# Allegro board 980XS-I6K51D-1119-2.brd

Outline 581.66 x 429.26 mm; copper layers: TOP, L02_GND, L03_DPS, L04_GND, L05_DPS, L06_GND, L07_DPS, L08_GND, L09_DPS, L10_GND, L11_DPS, L12_GND, L13_SIGNAL, L14_GND, L15_SIGNAL, L16_GND, L17_SIGNAL, L18_GND, L19_SIGNAL, L20_GND, L21_SIGNAL, L22_GND, L23_SIGNAL, L24_GND, L25_SIGNAL, L26_GND, L27_SIGNAL, L28_GND, L29_SIGNAL, L30_GND, L31_SIGNAL, L32_GND, L33_SIGNAL, L34_GND, L35_DPS, L36_UDB, L37_GND, BOTTOM. Coordinates in mm from the lower left corner of the outline.
Outline path: 0,429.26 206.45,429.26 arc(217.17,423.61) 227.89,429.26 353.77,429.26 arc(364.49,423.61) 375.21,429.26 581.66,429.26 581.66,0 301.55,0 arc(290.83,5.65) 280.11,0 0,0 0,429.26

## Placement (name value [footprint] x y rotation side)
BD5  BD120-1.5A-S4-MU  [FB0402]  543.47 239.79 270 bottom
BD9  BD120-1.5A-S4-MU  [FB0402]  224.66 243.83 270 bottom
BD21  BD120-1.5A-S4-MU  [FB0402]  222.95 232.36 0 bottom
BD1721  BD120-1.5A-S4-MU  [FB0402]  543.47 226.84 270 bottom
BD1722  BD120-1.5A-S4-MU  [FB0402]  543.09 213.5 270 bottom
BD1723  BD120-1.5A-S4-MU  [FB0402]  543.09 199.41 270 bottom
BD1728  BD120-1.5A-S4-MU  [FB0402]  245.15 273.73 180 bottom
BDB5  BD120-1.5A-S4-MU  [FB0402]  232.36 264.33 270 bottom
BDB6  BD120-1.5A-S4-MU  [FB0402]  220.55 264.33 270 bottom
BDB7  BD120-1.5A-S4-MU  [FB0402]  211.03 234.89 0 bottom
BDB8  BD120-1.5A-S4-MU  [FB0402]  211.03 246.46 0 bottom
BGA293-9X7-P0.4  REF-CODE-SOCKET  [SOCKET_CODE]  284.21 469.34 0 top
C262  0.1U-16-X7S-S2-MU  [C0201]  224.41 232.06 270 bottom
C264  NC/10U-16-X7R-S8-SS  [C0805]  243.28 276.07 0 bottom
C267  33P-50-N-S2-MU  [C0201]  236.23 224.18 270 bottom
C268  33P-50-N-S2-MU  [C0201]  235.23 224.18 270 bottom
C271  12P-50-N-S4-MU  [C0402]  240.52 270.61 90 bottom
C272  12P-50-N-S4-MU  [C0402]  240.52 272.63 270 bottom
C278  1U-10-X7S-S4-TDK  [C0402]  232.87 293.11 0 bottom
C279  1U-10-X7S-S4-TDK  [C0402]  232.87 291.92 0 bottom
C280  0.1U-16-X-S4-MU  [C0402]  232.87 290.72 0 bottom
C281  0.1U-16-X-S4-MU  [C0402]  232.87 289.53 0 bottom
C282  1U-10-X7S-S4-TDK  [C0402]  238.7 286.48 270 bottom
C283  0.1U-16-X-S4-MU  [C0402]  237.54 286.48 270 bottom
C284  1U-10-X7S-S4-TDK  [C0402]  237.62 297.85 90 bottom
C285  0.1U-16-X-S4-MU  [C0402]  238.81 297.85 90 bottom
C286  0.1U-16-X-S4-MU  [C0402]  233.82 297.35 180 bottom
C288  1000P-50-X7R-S2-MU  [C0201]  233.49 295.57 270 bottom
C289  0.1U-16-X-S4-MU  [C0402]  231.21 294.81 270 bottom
C290  NC/0.1U-16-X7R-S4-TY  [C0402]  224.35 296.03 180 bottom
C298  0.1U-16-X7S-S2-MU  [C0201]  222.95 292.65 90 bottom
C299  0.1U-16-X7S-S2-MU  [C0201]  220.02 296.97 180 bottom
C300  0.1U-16-X-S4-MU  [C0402]  220.67 290.87 270 bottom
C301  1U-10-X7S-S4-TDK  [C0402]  219.51 290.87 270 bottom
C302  10P-50-N-S2-MU  [C0201]  229.27 260.38 270 bottom
C309  10P-50-N-S2-MU  [C0201]  241.08 260.38 270 bottom
C310  10P-50-N-S2-MU  [C0201]  241.08 261.68 90 bottom
C318  10P-50-N-S2-MU  [C0201]  241.08 263.42 270 bottom
C320  10P-50-N-S2-MU  [C0201]  229.27 261.68 90 bottom
C332  2.2U-16-X7R-S6-TY  [C0603]  109.1 226.65 270 bottom
C333  0.1U-16-X-S4-MU  [C0402]  107.7 226.83 270 bottom
C334  10U-16-X7R-S8-SS  [C0805]  100.08 226.53 90 bottom
C335  0.1U-16-X-S4-MU  [C0402]  101.74 226.35 90 bottom
C336  4.7U-25-X7R-S8-TY  [C0805]  87.58 240.29 270 bottom
C337  0.1U-16-X-S4-MU  [C0402]  87.6 237.74 180 bottom
C338  4.7U-25-X7R-S8-TY  [C0805]  106 240.29 270 bottom
C339  0.1U-16-X-S4-MU  [C0402]  106.03 237.74 180 bottom
C400  2.2U-10-X-S4-MU  [C0402]  540.94 239.82 90 bottom
C401  0.1U-16-X-S4-MU  [C0402]  542.2 239.82 90 bottom
C402  4.7U-6.3-X-S4-MU  [C0402]  523.51 152.12 0 bottom
C403  22U-16-X5R-SA-SS  [C1206]  520.12 149.58 90 bottom
C404  10U-25-X-S6-MU  [C0603]  519.86 146.58 180 bottom
C405  1U-10-X7S-S4-TDK  [C0402]  520.37 145.26 180 bottom
C406  0.1U-16-X-S4-MU  [C0402]  90.42 287.53 180 bottom
C407  2.2U-10-X-S4-MU  [C0402]  82.6 288.09 270 bottom
C408  0.1U-16-X-S4-MU  [C0402]  83.74 288.09 270 bottom
C409  0.1U-16-X-S4-MU  [C0402]  73.71 296.14 0 bottom
C410  0.1U-16-X-S4-MU  [C0402]  508.66 225.73 270 bottom
C411  0.1U-16-X-S4-MU  [C0402]  498.63 233.78 0 bottom
C412  2.2U-10-X-S4-MU  [C0402]  507.51 225.73 270 bottom
C413  0.1U-16-X-S4-MU  [C0402]  515.33 225.16 180 bottom
C415  0.1U-16-X-S4-MU  [C0402]  90.42 273.81 180 bottom
C416  2.2U-10-X-S4-MU  [C0402]  82.6 274.38 270 bottom
C417  0.1U-16-X-S4-MU  [C0402]  73.71 282.43 0 bottom
C475  4.7U-6.3-X-S4-MU  [C0402]  256.72 272.09 270 bottom
C476  1U-10-X7S-S4-TDK  [C0402]  249.86 275.23 90 bottom
C477  10U-25-X-S6-MU  [C0603]  251.18 275.74 90 bottom
C478  22U-16-X5R-SA-SS  [C1206]  254.18 275.49 0 bottom
C894  0.1U-16-X-S4-MU  [C0402]  542.2 226.87 90 bottom
C895  2.2U-10-X-S4-MU  [C0402]  540.94 226.87 90 bottom
C910  0.1U-16-X-S4-MU  [C0402]  83.74 274.38 270 bottom
C922  0.1U-16-X-S4-MU  [C0402]  232.36 262.2 270 bottom
C923  0.1U-16-X-S4-MU  [C0402]  220.55 262.2 270 bottom
C924  10P-50-N-S2-MU  [C0201]  229.27 263.42 270 bottom
C955  0.1U-16-X-S4-MU  [C0402]  90.42 260.1 180 bottom
C956  2.2U-10-X-S4-MU  [C0402]  82.6 260.66 270 bottom
C957  0.1U-16-X-S4-MU  [C0402]  73.71 268.71 0 bottom
C958  0.1U-16-X-S4-MU  [C0402]  83.74 260.66 270 bottom
C983  0.1U-16-X-S4-MU  [C0402]  541.82 213.53 90 bottom
C984  2.2U-10-X-S4-MU  [C0402]  540.55 213.53 90 bottom
C985  0.1U-16-X-S4-MU  [C0402]  541.82 199.44 90 bottom
C986  2.2U-10-X-S4-MU  [C0402]  540.55 199.44 90 bottom
C1074  0.1U-16-X7S-S2-MU  [C0201_MINI]  243.6 273.98 90 bottom
C1082  0.1U-16-X-S4-MU  [C0402]  508.66 207.57 270 bottom
C1083  0.1U-16-X-S4-MU  [C0402]  248.15 224.79 0 bottom
C1085  2.2U-10-X-S4-MU  [C0402]  498.63 215.62 0 bottom
C1086  10P-50-N-S2-MU  [C0201]  214.98 255.18 0 bottom
C1087  10P-50-N-S2-MU  [C0201]  213.69 255.18 180 bottom
C1088  10P-50-N-S2-MU  [C0201]  211.94 255.18 0 bottom
C1089  0.1U-16-X-S4-MU  [C0402]  213.16 234.89 0 bottom
C1090  0.1U-16-X-S4-MU  [C0402]  213.16 246.46 0 bottom
C1091  10P-50-N-S2-MU  [C0201]  213.69 243.61 180 bottom
C1093  10P-50-N-S2-MU  [C0201]  214.98 243.61 0 bottom
CA1  0.1U-16-X-S4-MU  [C0402]  205.72 237.49 0 bottom
CA2  10U-25-X7R-SA  [C1206]  205.72 240.03 0 bottom
CA7  10U-25-X7R-SA  [C1206]  245.12 285.5 0 bottom
CA8  0.1U-16-X-S4-MU  [C0402]  245.12 283.46 0 bottom
CA19  470U-25-E-S10.4X10.4  [EC_10P3X10_S]  189.66 230.89 90 bottom
CA20  10U-25-X7R-SA  [C1206]  216.67 285.5 0 bottom
CA21  0.1U-16-X-S4-MU  [C0402]  216.67 283.46 0 bottom
CA22  10U-25-X7R-SA  [C1206]  222.76 281.43 0 bottom
CA23  0.1U-16-X-S4-MU  [C0402]  222.76 279.4 0 bottom
CA24  10U-25-X7R-SA  [C1206]  216.67 281.43 0 bottom
CA25  0.1U-16-X-S4-MU  [C0402]  216.67 279.4 0 bottom
CA26  10U-25-X7R-SA  [C1206]  235.18 281.43 0 bottom
CA27  0.1U-16-X-S4-MU  [C0402]  235.18 279.4 0 bottom
CA34  10U-25-X7R-SA  [C1206]  245.12 281.43 0 bottom
CA35  0.1U-16-X-S4-MU  [C0402]  245.12 279.4 0 bottom
CA36  0.1U-16-X-S4-MU  [C0402]  228.85 279.4 0 bottom
CA37  10U-25-X7R-SA  [C1206]  228.85 281.43 0 bottom
CA38  10U-25-X7R-SA  [C1206]  188.01 283.69 0 top
CA39  0.1U-16-X-S4-MU  [C0402]  206.26 242.54 0 top
CB1  0.1U-25-X-S6  [C0603]  416.81 133.35 0 bottom
CB2  10U-25-X7R-SA  [C1206]  416.81 130.81 0 bottom
CB3  0.1U-25-X-S6  [C0603]  560.07 133.35 0 bottom
CB4  10U-25-X7R-SA  [C1206]  560.07 130.81 0 bottom
CB5  0.1U-25-X-S6  [C0603]  560.07 295.91 180 bottom
CB6  10U-25-X7R-SA  [C1206]  560.07 298.45 180 bottom
CB7  0.1U-25-X-S6  [C0603]  424.16 290.83 180 bottom
CB8  10U-25-X7R-SA  [C1206]  424.16 293.37 180 bottom
CB9  0.1U-25-X-S6  [C0603]  164.85 133.35 0 bottom
CB10  10U-25-X7R-SA  [C1206]  164.85 130.81 0 bottom
CB11  0.1U-25-X-S6  [C0603]  157.46 290.83 180 bottom
CB12  10U-25-X7R-SA  [C1206]  157.46 293.37 180 bottom
CB13  0.1U-25-X-S6  [C0603]  21.59 133.35 0 bottom
CB14  10U-25-X7R-SA  [C1206]  21.59 130.81 0 bottom
CB15  0.1U-25-X-S6  [C0603]  21.59 295.91 180 bottom
CB16  10U-25-X7R-SA  [C1206]  21.59 298.45 180 bottom
CC1  0.1U-16-X7S-S2-MU  [C0201_MINI]  230.19 246.91 180 bottom
CC2  0.1U-16-X7S-S2-MU  [C0201_MINI]  230.5 250.48 90 bottom
CC3  0.1U-16-X7S-S2-MU  [C0201_MINI]  228.87 245.61 180 bottom
CC4  0.1U-16-X7S-S2-MU  [C0201_MINI]  230.19 246.26 180 bottom
CC5  0.1U-16-X7S-S2-MU  [C0201_MINI]  231.16 246.56 90 bottom
CC6  0.1U-16-X7S-S2-MU  [C0201_MINI]  228.87 244.96 180 bottom
CC7  0.1U-16-X7S-S2-MU  [C0201_MINI]  232.14 244.96 0 bottom
CC8  0.1U-16-X7S-S2-MU  [C0201_MINI]  230.5 243.97 270 bottom
CC9  0.1U-16-X7S-S2-MU  [C0201_MINI]  231.16 243.97 270 bottom
CC12  0.1U-16-X7S-S2-MU  [C0201_MINI]  229.86 244.62 270 bottom
CC13  0.1U-16-X7S-S2-MU  [C0201_MINI]  228.24 241.05 180 bottom
CC14  0.1U-16-X7S-S2-MU  [C0201_MINI]  231.46 245.61 0 bottom
CC15  0.1U-16-X7S-S2-MU  [C0201_MINI]  230.19 245.61 180 bottom
CC16  0.1U-16-X7S-S2-MU  [C0201_MINI]  230.84 244.96 180 bottom
CC70  0.1U-16-X7S-S2-MU  [C0201_MINI]  232.46 242.67 270 bottom
CC71  0.1U-16-X7S-S2-MU  [C0201_MINI]  235.38 243 0 bottom
CC73  0.1U-16-X7S-S2-MU  [C0201_MINI]  227.91 242.68 90 bottom
CC84  0.1U-16-X7S-S2-MU  [C0201_MINI]  233.11 250.48 90 bottom
CC85  0.1U-16-X7S-S2-MU  [C0201_MINI]  231.15 250.48 90 bottom
CC86  0.1U-16-X7S-S2-MU  [C0201_MINI]  232.46 250.48 90 bottom
CC87  0.1U-16-X7S-S2-MU  [C0201_MINI]  232.14 246.26 180 bottom
CC88  0.1U-16-X7S-S2-MU  [C0201_MINI]  233.11 244 270 bottom
CC89  0.1U-16-X7S-S2-MU  [C0201_MINI]  227.91 244.66 270 bottom
CC90  0.1U-16-X7S-S2-MU  [C0201_MINI]  231.8 250.48 90 bottom
CC91  0.1U-16-X7S-S2-MU  [C0201_MINI]  234.06 243.65 0 bottom
CC92  0.1U-16-X7S-S2-MU  [C0201_MINI]  232.45 244 270 bottom
CC96  0.1U-16-X7S-S2-MU  [C0201_MINI]  231.51 247.56 180 bottom
CC101  0.1U-16-X7S-S2-MU  [C0201_MINI]  230.84 240.4 0 bottom
CC103  0.1U-16-X7S-S2-MU  [C0201_MINI]  231.81 242.02 90 bottom
CC105  0.1U-16-X7S-S2-MU  [C0201_MINI]  232.46 240.72 270 bottom
CC112  0.1U-16-X7S-S2-MU  [C0201_MINI]  235.06 250.48 90 bottom
CC130  0.1U-16-X7S-S2-MU  [C0201_MINI]  228.24 241.7 180 bottom
CC182  0.1U-16-X7S-S2-MU  [C0201_MINI]  226.61 250.48 90 bottom
CC195  4.7U-25-X7R-S8-TY  [C0805]  187.38 280.77 0 top
CC202  0.1U-16-X7S-S2-MU  [C0201_MINI]  226.28 245.61 180 bottom
CC211  0.1U-16-X7S-S2-MU  [C0201_MINI]  230.5 242.02 90 bottom
CC212  0.1U-16-X7S-S2-MU  [C0201_MINI]  229.53 241.06 180 bottom
CC213  0.1U-16-X7S-S2-MU  [C0201_MINI]  231.16 242.02 90 bottom
CC214  0.1U-16-X7S-S2-MU  [C0201_MINI]  192.95 287.28 90 top
CC215  0.1U-16-X7S-S2-MU  [C0201_MINI]  231.81 239.42 90 bottom
CC216  0.1U-16-X7S-S2-MU  [C0201_MINI]  228.56 238.78 270 bottom
CC217  0.1U-16-X7S-S2-MU  [C0201_MINI]  194.35 287.28 90 top
CC218  0.1U-16-X7S-S2-MU  [C0201_MINI]  195.75 287.28 90 top
CC219  0.1U-16-X7S-S2-MU  [C0201_MINI]  197.15 287.28 90 top
CC220  0.1U-16-X7S-S2-MU  [C0201_MINI]  198.56 287.28 90 top
CON1  MS-PWR-CONN-30P-V3-SI6D70  [CONN_15X2_100MIL_PH_MS_V2]  24.74 150.36 90 top
CSDPS303  V93K_CSDPS_DPS32  [PG_VG93K_PF_DPS32_G1D303]  327.66 46.99 0 top
CSDPS307  V93K_CSDPS_DPS32  [PG_VG93K_PF_DPS32_G1D307]  401.32 46.99 0 top
CSDPS310  V93K_CSDPS_DPS32  [PG_VG93K_PF_DPS32_G2D310]  401.32 361.95 0 top
CSDPS314  V93K_CSDPS_DPS32  [PG_VG93K_PF_DPS32_G2D314]  327.66 361.95 0 top
CSDPS319  V93K_CSDPS_DPS32  [PG_VG93K_PF_DPS32_G3D319]  180.34 46.99 0 top
CSDPS323  V93K_CSDPS_DPS32  [PG_VG93K_PF_DPS32_G3D323]  254 46.99 0 top
CSDPS426  V93K_CSDPS  [PG_VG93K_PF_DPS32_G8D426]  254 361.95 0 top
CSDPS430  V93K_CSDPS  [PG_VG93K_PF_DPS32_G8D430]  180.34 361.95 0 top
D101  V93K_CH  [PG_VG93K_F_G1D101]  327.66 97.79 0 top
D102  V93K_CH  [PG_VG93K_F_G1D102]  327.66 77.47 0 top
D103  V93K_CH  [PG_VG93K_F_G1D103]  327.66 57.15 0 top
D104  V93K_CH  [PG_VG93K_F_G1D104]  327.66 36.83 0 top
D105  V93K_CH  [PG_VG93K_F_G1D105]  401.32 97.79 0 top
D106  V93K_CH  [PG_VG93K_F_G1D106]  401.32 77.47 0 top
D107  V93K_CH  [PG_VG93K_F_G1D107]  401.32 57.15 0 top
D108  V93K_CH  [PG_VG93K_F_G1D108]  401.32 36.83 0 top
D109  V93K_CH  [PG_VG93K_F_G2D109]  401.32 331.47 0 top
D110  V93K_CH  [PG_VG93K_F_G2D110]  401.32 351.79 0 top
D111  V93K_CH  [PG_VG93K_F_G2D111]  401.32 372.11 0 top
D112  V93K_CH  [PG_VG93K_F_G2D112]  401.32 392.43 0 top
D113  V93K_CH  [PG_VG93K_F_G2D113]  327.66 331.47 0 top
D114  V93K_CH  [PG_VG93K_F_G2D114]  327.66 351.79 0 top
D115  V93K_CH  [PG_VG93K_F_G2D115]  327.66 372.11 0 top
D116  V93K_CH  [PG_VG93K_F_G2D116]  327.66 392.43 0 top
D117  V93K_CH  [PG_VG93K_F_G3D117]  180.34 97.79 0 top
D118  V93K_CH  [PG_VG93K_F_G3D118]  180.34 77.47 0 top
D119  V93K_CH  [PG_VG93K_F_G3D119]  180.34 57.15 0 top
D120  V93K_CH  [PG_VG93K_F_G3D120]  180.34 36.83 0 top
D121  V93K_CH  [PG_VG93K_F_G3D121]  254 97.79 0 top
D122  V93K_CH  [PG_VG93K_F_G3D122]  254 77.47 0 top
D123  V93K_CH  [PG_VG93K_F_G3D123]  254 57.15 0 top
D124  V93K_CH  [PG_VG93K_F_G3D124]  254 36.83 0 top
D125  V93K_CH  [PG_VG93K_F_G4D125]  33.02 97.79 0 top
D126  V93K_CH  [PG_VG93K_F_G4D126]  33.02 77.47 0 top
D127  V93K_CH  [PG_VG93K_F_G4D127]  33.02 57.15 0 top
D128  V93K_CH  [PG_VG93K_F_G4D128]  33.02 36.83 0 top
D129  V93K_CH  [PG_VG93K_F_G4D129]  106.68 97.79 0 top
D130  V93K_CH  [PG_VG93K_F_G4D130]  106.68 77.47 0 top
D131  V93K_CH  [PG_VG93K_F_G4D131]  106.68 57.15 0 top
D132  V93K_CH  [PG_VG93K_F_G4D132]  106.68 36.83 0 top
D201  V93K_CH  [PG_VG93K_F_G5D201]  474.98 97.79 0 top
D202  V93K_CH  [PG_VG93K_F_G5D202]  474.98 77.47 0 top
D203  V93K_CH  [PG_VG93K_F_G5D203]  474.98 57.15 0 top
D204  V93K_CH  [PG_VG93K_F_G5D204]  474.98 36.83 0 top
D205  V93K_CH  [PG_VG93K_F_G5D205]  548.64 97.79 0 top
D206  V93K_CH  [PG_VG93K_F_G5D206]  548.64 77.47 0 top
D207  V93K_CH  [PG_VG93K_F_G5D207]  548.64 57.15 0 top
D208  V93K_CH  [PG_VG93K_F_G5D208]  548.64 36.83 0 top
D209  V93K_CH  [PG_VG93K_F_G6D209]  548.64 331.47 0 top
D210  V93K_CH  [PG_VG93K_F_G6D210]  548.64 351.79 0 top
D211  V93K_CH  [PG_VG93K_F_G6D211]  548.64 372.11 0 top
D212  V93K_CH  [PG_VG93K_F_G6D212]  548.64 392.43 0 top
D213  V93K_CH  [PG_VG93K_F_G6D213]  474.98 331.47 0 top
D214  V93K_CH  [PG_VG93K_F_G6D214]  474.98 351.79 0 top
D215  V93K_CH  [PG_VG93K_F_G6D215]  474.98 372.11 0 top
D216  V93K_CH  [PG_VG93K_F_G6D216]  474.98 392.43 0 top
D217  V93K_CH  [PG_VG93K_F_G7D217]  106.68 331.47 0 top
D218  V93K_CH  [PG_VG93K_F_G7D218]  106.68 351.79 0 top
D219  V93K_CH  [PG_VG93K_F_G7D219]  106.68 372.11 0 top
D220  V93K_CH  [PG_VG93K_F_G7D220]  106.68 392.43 0 top
D221  V93K_CH  [PG_VG93K_F_G7D221]  33.02 331.47 0 top
D222  V93K_CH  [PG_VG93K_F_G7D222]  33.02 351.79 0 top
D223  V93K_CH  [PG_VG93K_F_G7D223]  33.02 372.11 0 top
D224  V93K_CH  [PG_VG93K_F_G7D224]  33.02 392.43 0 top
D225  V93K_CH_ND  [PG_VG93K_F_G8D225_ND]  254 331.47 0 top
D226/D626  V93K_PS1600 HD  [PG_VG93K_F_HSM_G8D226_626_ND]  254 351.79 0 top
D227  V93K_CH  [PG_VG93K_F_G8D227]  254 372.11 0 top
D228  V93K_CH  [PG_VG93K_F_G8D228]  254 392.43 0 top
D229  V93K_CH_ND  [PG_VG93K_F_G8D229_ND]  180.34 331.47 0 top
D230/D630  V93K_PS1600 HD  [PG_VG93K_F_HSM_G8D230_630_ND]  180.34 351.79 0 top
D231  V93K_CH  [PG_VG93K_F_G8D231]  180.34 372.11 0 top
D232  V93K_CH  [PG_VG93K_F_G8D232]  180.34 392.43 0 top
D325  V93K_CH  [PG_VG93K_F_G4D325]  33.02 87.63 0 top
D326  V93K_CH  [PG_VG93K_F_G4D326]  33.02 67.31 0 top
D327  V93K_CH  [PG_VG93K_F_G4D327]  33.02 46.99 0 top
D328  V93K_CH  [PG_VG93K_F_G4D328]  33.02 26.67 0 top
D329  V93K_CH  [PG_VG93K_F_G4D329]  106.68 87.63 0 top
D330  V93K_CH  [PG_VG93K_F_G4D330]  106.68 67.31 0 top
D331  V93K_CH  [PG_VG93K_F_G4D331]  106.68 46.99 0 top
D332  V93K_CH  [PG_VG93K_F_G4D332]  106.68 26.67 0 top
D409  V93K_CH  [PG_VG93K_F_G6D409]  548.64 341.63 0 top
D410  V93K_CH  [PG_VG93K_F_G6D410]  548.64 361.95 0 top
D411  V93K_CH  [PG_VG93K_F_G6D411]  548.64 382.27 0 top
D412  V93K_CH  [PG_VG93K_F_G6D412]  548.64 402.59 0 top
D413  V93K_CH  [PG_VG93K_F_G6D413]  474.98 341.63 0 top
D414  V93K_CH  [PG_VG93K_F_G6D414]  474.98 361.95 0 top
D415  V93K_CH  [PG_VG93K_F_G6D415]  474.98 382.27 0 top
D416  V93K_CH  [PG_VG93K_F_G6D416]  474.98 402.59 0 top
D417  V93K_CH  [PG_VG93K_F_G7D417]  106.68 341.63 0 top
D418  V93K_CH  [PG_VG93K_F_G7D418]  106.68 361.95 0 top
D419  V93K_CH  [PG_VG93K_F_G7D419]  106.68 382.27 0 top
D420  V93K_CH  [PG_VG93K_F_G7D420]  106.68 402.59 0 top
D421  V93K_CH  [PG_VG93K_F_G7D421]  33.02 341.63 0 top
D422  V93K_CH  [PG_VG93K_F_G7D422]  33.02 361.95 0 top
D423  V93K_CH  [PG_VG93K_F_G7D423]  33.02 382.27 0 top
D424  V93K_CH  [PG_VG93K_F_G7D424]  33.02 402.59 0 top
D425  V93K_CH_ND  [PG_VG93K_F_G8D425_ND]  254 341.63 0 top
D427  V93K_CH  [PG_VG93K_F_G8D427]  254 382.27 0 top
D428  V93K_CH  [PG_VG93K_F_G8D428]  254 402.59 0 top
D429  V93K_CH_ND  [PG_VG93K_F_G8D429_ND]  180.34 341.63 0 top
D431  V93K_CH  [PG_VG93K_F_G8D431]  180.34 382.27 0 top
D432  V93K_CH  [PG_VG93K_F_G8D432]  180.34 402.59 0 top
DPS1  V93K_DPS  [PG_VG93K_F_G1DPS1]  401.32 16.51 0 top
DPS2  V93K_DPS  [PG_VG93K_F_G2DPS2]  327.66 412.75 0 top
DPS3  V93K_DPS  [PG_VG93K_F_G3DPS3]  254 16.51 0 top
DPS8  V93K_DPS  [PG_VG93K_F_G8DPS8]  180.34 412.75 0 top
FD1  -  [FD_040_V2]  10.16 129.54 0 top
FD2  -  [FD_040_V2]  11.43 298.45 0 top
FD3  -  [FD_040_V2]  157.48 298.45 0 top
FD4  -  [FD_040_V2]  157.48 130.81 0 top
FD5  -  [FD_040_V2]  424.18 298.45 0 top
FD6  -  [FD_040_V2]  424.18 130.81 0 top
FD7  -  [FD_040_V2]  570.23 298.45 0 top
FD8  -  [FD_040_V2]  570.23 130.81 0 top
FD9  -  [FD_040_V2]  10.16 129.54 180 bottom
FD10  -  [FD_040_V2]  11.43 298.45 180 bottom
FD11  -  [FD_040_V2]  157.48 298.45 180 bottom
FD12  -  [FD_040_V2]  157.48 130.81 180 bottom
FD13  -  [FD_040_V2]  424.18 298.45 180 bottom
FD14  -  [FD_040_V2]  424.18 130.81 180 bottom
FD15  -  [FD_040_V2]  570.23 298.45 180 bottom
FD16  -  [FD_040_V2]  570.23 130.81 180 bottom
H1  M3-HOLE  [M3_NPTH169]  158.75 241.3 0 top
H2  M3-HOLE  [M3_NPTH169]  158.75 187.96 0 top
H3  M3-HOLE  [M3_NPTH169]  422.91 241.3 0 top
H4  M3-HOLE  [M3_NPTH169]  422.91 187.96 0 top
J1  HDR-2X1-M  [JP_2P_100]  10.78 152.9 180 top
J2  HDR-2X1-M  [JP_2P_100]  14.16 152.9 180 top
JG261002WW011  REF-CODE-SOCKET  [SOCKET_CODE]  284.82 469.34 0 top
JP1  A2001WV0-4PS_V2  [CONN_S4X1_2MM_JWT]  100.37 260.08 90 top
K2  UA2-5NJ-A-V3  [RL_NECUA2_5V_V3]  119.04 248.1 90 bottom
K3  UA2-5NJ-A-V3  [RL_NECUA2_5V_V3]  112.69 248.1 90 bottom
K4  UA2-5NJ-A-V3  [RL_NECUA2_5V_V3]  106.34 248.1 90 bottom
K5  UA2-5NJ-A-V3  [RL_NECUA2_5V_V3]  99.99 248.1 90 bottom
K6  UA2-5NJ-A-V3  [RL_NECUA2_5V_V3]  93.64 248.1 90 bottom
K7  UA2-5NJ-A-V3  [RL_NECUA2_5V_V3]  87.29 248.1 90 bottom
K29  G6K-2F-Y-5V-A  [RL_G6K2F-Y_5V_OMRON]  231.89 271.62 0 bottom
K32  G6K-2F-Y-5V-A  [RL_G6K2F-Y_5V_OMRON]  235.73 231.79 270 bottom
K34  G6K-2P-Y5VDC-A  [RL_OMRONG6K2PY_5V]  166.88 269.24 90 bottom
K96  EC2-5NJ  [RL_NECEC2_10P_5V]  203.76 229.39 0 bottom
K109  G6K-2P-Y5VDC-A  [RL_OMRONG6K2PY_5V]  166.88 293.62 90 bottom
K110  G6K-2P-Y5VDC-A  [RL_OMRONG6K2PY_5V]  176.53 293.62 90 bottom
LDB1  LDG-2-S8  [LED_0805]  40.96 298.45 0 top
LOGO1  LOGO_SR_SigmaStar  [LOGO_SR_SIGMASTAR]  29.16 434.98 0 top
LOGO2  -  [LOGO_KT_KSMT]  81.21 434.37 0 top
LRB1  330-1-S6  [R0603]  42.89 298.45 180 bottom
MBD1  BD120-1.5A-S4-MU  [FB0402]  222.95 294.3 270 bottom
MK1  AQY221R2MY-V2  [RL_AQY221R2MY_5V_V2]  225.87 288.33 180 bottom
MK2  AQY221R2MY-V2  [RL_AQY221R2MY_5V_V2]  225.87 293.67 180 bottom
MK3  AQY221R2MY-V2  [RL_AQY221R2MY_5V_V2]  225.87 285.79 180 bottom
MK4  AQY221R2MY-V2  [RL_AQY221R2MY_5V_V2]  225.87 291 180 bottom
MR1  1M-1-S4  [R0402_UNBGA_V2]  236.22 286.48 270 bottom
MR2  1K-0.01-S4  [R0402_UNBGA_V2]  235.91 297.35 180 bottom
MR3  1K-0.01-S4  [R0402_UNBGA_V2]  233.82 298.37 180 bottom
MR4  1K-0.01-S4  [R0402_UNBGA_V2]  233.82 299.38 180 bottom
MR5  1K-0.01-S4  [R0402_UNBGA_V2]  235.91 299.38 0 bottom
MR6  1K-0.01-S4  [R0402_UNBGA_V2]  235.91 298.37 0 bottom
MR7  332K-1-S4  [R0402_UNBGA_V2]  235.21 285.63 90 bottom
MR8  1K-0.01-S4  [R0402_UNBGA_V2]  224.35 299.38 180 bottom
MR9  499-0.1-S4  [R0402]  224.35 298.27 180 bottom
MR10  0-5-S4  [R0402]  224.35 297.15 0 bottom
MR11  750-1-S4  [R0402]  229.3 288.97 180 bottom
MR12  360-1-S6  [R0603]  229.68 287.7 180 bottom
MR13  750-1-S4  [R0402]  229.3 294.3 180 bottom
MR14  1.2K-1-S4  [R0402]  229.05 286.43 0 bottom
MR15  360-1-S6  [R0603]  229.68 293.03 180 bottom
MR16  750-1-S4  [R0402]  229.3 291.64 180 bottom
MR17  360-1-S6  [R0603]  229.68 290.37 180 bottom
MR18  11K-0.1-S4  [R0402]  221.81 290.87 270 bottom
MR19  1K-0.01-S4  [R0402_UNBGA_V2]  222.95 290.87 90 bottom
MU1  KSMT002-0.15A-A-SC70-5  [SC70_5P]  233.15 287.63 90 bottom
MU2  KSMT004-SO8  [SO8_244X127MM]  238.06 292.02 90 bottom
MU3  KSMT003-MSOP8  [SO8_172X0P65MM]  228.92 297.48 180 bottom
MU4  MAX6070AAUT30+T-SOT23  [SOT23_6P_0P95X2P7MM_H1P45MM]  220.67 294.3 0 bottom
NOREF  -  []  124.28 140.9 90 top
NOREF#2  -  []  307.25 174.3 90 top
NOREF#3  -  []  232.46 182.42 90 top
NOREF#4  -  []  352.8 187.32 90 top
NOREF#5  -  []  241.08 260.08 90 top
NOREF#6  -  []  277.44 193.76 90 top
NOREF#7  -  []  228.62 185.61 0 top
NOREF#8  -  []  333.39 195.18 0 top
NOREF#9  -  []  87.81 209.07 0 top
NOREF#10  -  []  104.34 220.6 90 top
NOREF#11  -  []  476.48 224.56 0 top
NOREF#12  -  []  77.67 261.24 0 top
NOREF#13  -  []  311.4 246.12 0 top
NOREF#14  -  []  267.99 181.7 0 top
NOREF#15  -  []  153.87 484.32 0 top
NOREF#16  -  []  224.78 262.58 0 top
NOREF#17  -  []  479.53 253.51 0 top
NOREF#18  -  []  347.7 249.57 90 top
NOREF#19  -  []  31.87 483.76 90 top
NOREF#20  -  []  241.08 261.38 90 top
NOREF#21  -  []  270.26 244.4 0 top
NOREF#22  -  []  313.07 243.95 90 top
NOREF#23  -  []  269.3 185.2 0 top
NOREF#24  -  []  458.65 149.38 0 top
NOREF#25  -  []  116.75 133.82 90 top
NOREF#26  -  []  227 260.55 0 top
NOREF#27  -  []  474.12 142.82 0 top
NOREF#28  -  []  265.48 175.27 0 top
NOREF#29  -  []  95.24 251.7 0 top
NOREF#30  -  []  356.61 287.27 90 top
NOREF#31  -  []  331.16 247.72 90 top
NOREF#32  -  []  318.9 484.08 0 top
NOREF#33  -  []  276.22 286.06 90 top
NOREF#34  -  []  34.88 484.4 0 top
NOREF#35  -  []  36.58 484.08 0 top
NOREF#36  -  []  480.78 186.81 90 top
NOREF#37  -  []  533.22 484.4 0 top
NOREF#38  -  []  354.44 146.64 0 top
NOREF#39  -  []  229.3 185.2 0 top
NOREF#40  -  []  273.08 182.62 90 top
NOREF#41  -  []  296.21 252.91 90 top
NOREF#42  -  []  351.48 246.02 90 top
NOREF#43  -  []  352.04 250.05 0 top
NOREF#44  -  []  485.88 221.76 0 top
NOREF#45  -  []  303.34 202.36 90 top
NOREF#46  -  []  356.48 484.4 0 top
NOREF#47  -  []  547.34 225.47 0 top
NOREF#48  -  []  371.13 467.68 0 top
NOREF#49  -  []  294.29 243.93 0 top
NOREF#50  -  []  123.08 205.05 0 top
NOREF#51  -  []  253.99 253.86 90 top
NOREF#52  -  []  333.22 250.39 0 top
NOREF#53  -  []  43.3 484.4 0 top
NOREF#54  -  []  332.43 483.75 90 top
NOREF#55  -  []  351.39 190.05 0 top
NOREF#56  -  []  155.27 484.32 0 top
NOREF#57  -  []  120.02 132.32 90 top
NOREF#58  -  []  310.7 269.35 90 top
NOREF#59  -  []  313.56 189.57 90 top
NOREF#60  -  []  384.84 484.08 0 top
NOREF#61  -  []  347.56 144.79 90 top
NOREF#62  -  []  552.28 166.69 0 top
NOREF#63  -  []  543.98 154.6 0 top
NOREF#64  -  []  253.86 252.91 90 top
NOREF#65  -  []  460.48 190.01 0 top
NOREF#66  -  []  534.61 221.48 0 top
NOREF#67  -  []  255.58 242.65 90 top
NOREF#68  -  []  224.42 176.56 0 top
NOREF#69  -  []  333.86 181.35 90 top
NOREF#70  -  []  251.23 236.59 90 top
NOREF#71  -  []  223.27 233.14 0 top
NOREF#72  -  []  487.88 160.91 90 top
NOREF#73  -  []  301.29 297.9 0 top
NOREF#74  -  []  314.69 484.08 0 top
NOREF#75  -  []  271.6 241.11 90 top
NOREF#76  -  []  307.56 144.79 0 top
NOREF#77  -  []  87.81 132.56 90 top
NOREF#78  -  []  479.53 253.51 0 top
NOREF#79  -  []  50.11 483.76 90 top
NOREF#80  -  []  269.94 185.61 0 top
NOREF#81  -  []  551.91 164.1 0 top
NOREF#82  -  []  135.81 484.08 0 top
NOREF#83  -  []  104.48 172.65 90 top
NOREF#84  -  []  253.39 243.61 0 top
NOREF#85  -  []  348.31 179.21 0 top
NOREF#86  -  []  58.25 265.88 90 top
NOREF#87  -  []  236.89 133.69 0 top
NOREF#88  -  []  378.93 484.4 0 top
NOREF#89  -  []  479.53 221.76 0 top
NOREF#90  -  []  350.01 210.51 0 top
NOREF#91  -  []  340.96 247.12 90 top
NOREF#92  -  []  272.7 190.05 0 top
NOREF#93  -  []  107.94 156.45 0 top
NOREF#94  -  []  264.42 176.56 0 top
NOREF#95  -  []  86.59 157.25 0 top
NOREF#96  -  []  294.81 252.91 90 top
NOREF#97  -  []  299.33 196.13 0 top
NOREF#98  -  []  255.71 252.27 0 top
NOREF#99  -  []  245.83 229.63 90 top
NOREF#100  -  []  257.43 484.4 0 top
NOREF#101  -  []  254.66 241.23 0 top
NOREF#102  -  []  349.94 186.91 0 top
NOREF#103  -  []  236.59 262.58 0 top
NOREF#104  -  []  253.29 193.86 90 top
NOREF#105  -  []  312.05 238.99 0 top
NOREF#106  -  []  80.24 157.25 0 top
NOREF#107  -  []  390.16 484.4 0 top
NOREF#108  -  []  334.68 193.86 90 top
NOREF#109  -  []  22.25 484.4 0 top
NOREF#110  -  []  349.96 241.3 0 top
NOREF#111  -  []  27.86 484.4 0 top
NOREF#112  -  []  403.98 483.75 90 top
NOREF#113  -  []  271.19 209.1 90 top
NOREF#114  -  []  352.45 183.76 90 top
NOREF#115  -  []  312.23 232.39 90 top
NOREF#116  -  []  316.22 286.06 90 top
NOREF#117  -  []  274.97 145.37 90 top
NOREF#118  -  []  60.62 272.5 90 top
NOREF#119  -  []  255.83 199.63 0 top
NOREF#120  -  []  233.08 182.62 90 top
NOREF#121  -  []  272.13 244.72 90 top
NOREF#122  -  []  311.69 209.1 0 top
NOREF#123  -  []  100.39 217.95 0 top
NOREF#124  -  []  271.26 483.75 90 top
NOREF#125  -  []  272.35 289.79 90 top
NOREF#126  -  []  309.96 181.3 0 top
NOREF#127  -  []  240.83 157.63 90 top
NOREF#128  -  []  224.91 173.9 0 top
NOREF#129  -  []  334.36 181.55 0 top
NOREF#130  -  []  259.12 300.75 0 top
NOREF#131  -  []  242.43 272.37 0 top
NOREF#132  -  []  141.24 484.32 0 top
NOREF#133  -  []  253.99 193.86 90 top
NOREF#134  -  []  278.57 231.63 90 top
NOREF#135  -  []  255.56 192.47 90 top
NOREF#136  -  []  570 165.52 90 top
NOREF#137  -  []  263.09 174.94 0 top
NOREF#138  -  []  239.77 263.72 0 top
NOREF#139  -  []  475.18 192.66 90 top
NOREF#140  -  []  252.66 242 0 top
NOREF#141  -  []  295.58 182.65 90 top
NOREF#142  -  []  280.04 137.42 90 top
NOREF#143  -  []  475.32 144.71 90 top
NOREF#144  -  []  272.46 190.23 90 top
NOREF#145  -  []  97.99 252.35 90 top
NOREF#146  -  []  350.59 244.96 0 top
NOREF#147  -  []  559.22 133.8 90 top
NOREF#148  -  []  351.89 244.96 0 top
NOREF#149  -  []  233.08 242.62 90 top
NOREF#150  -  []  297.83 252.37 0 top
NOREF#151  -  []  475.32 208.21 90 top
NOREF#152  -  []  349.11 233.64 90 top
NOREF#153  -  []  35.18 484.08 0 top
NOREF#154  -  []  482.83 224.56 0 top
NOREF#155  -  []  270.74 181.59 0 top
NOREF#156  -  []  549.06 196.31 90 top
NOREF#157  -  []  268.52 184.61 90 top
NOREF#158  -  []  311.48 185.37 90 top
NOREF#159  -  []  232.45 183.76 90 top
NOREF#160  -  []  566.42 171.11 0 top
NOREF#161  -  []  333.16 241.35 90 top
NOREF#162  -  []  232.05 190.05 0 top
NOREF#163  -  []  232.21 244.43 0 top
NOREF#164  -  []  87.81 164.31 90 top
NOREF#165  -  []  310.18 484.4 0 top
NOREF#166  -  []  547.86 209.66 0 top
NOREF#167  -  []  313.73 183.95 90 top
NOREF#168  -  []  230.92 244.4 0 top
NOREF#169  -  []  226.71 185.85 0 top
NOREF#170  -  []  561.7 171.5 0 top
NOREF#171  -  []  308.25 233.12 0 top
NOREF#172  -  []  92.33 228.96 90 top
NOREF#173  -  []  251.96 193.56 0 top
NOREF#174  -  []  252.33 253.86 90 top
NOREF#175  -  []  251.16 187.72 90 top
NOREF#176  -  []  348.01 174.3 90 top
NOREF#177  -  []  85.49 154.45 0 top
NOREF#178  -  []  350.57 270.84 0 top
NOREF#179  -  []  226.54 133.3 90 top
NOREF#180  -  []  120.64 251.7 0 top
NOREF#181  -  []  274.23 187.83 0 top
NOREF#182  -  []  119.44 249.7 0 top
NOREF#183  -  []  250.42 484.4 0 top
NOREF#184  -  []  273.11 190.23 90 top
NOREF#185  -  []  237.95 138.45 90 top
NOREF#186  -  []  271.94 247.8 0 top
NOREF#187  -  []  541.61 150.18 0 top
NOREF#188  -  []  315.48 297.35 0 top
NOREF#189  -  []  343.09 174.94 0 top
NOREF#190  -  []  108.69 154.45 0 top
NOREF#191  -  []  231.81 179.17 90 top
NOREF#192  -  []  303.27 235.18 0 top
NOREF#193  -  []  275.44 254.76 90 top
NOREF#194  -  []  85 264.21 0 top
NOREF#195  -  []  458.47 237.49 90 top
NOREF#196  -  []  289.83 165.63 90 top
NOREF#197  -  []  130.08 483.84 90 top
NOREF#198  -  []  255.71 242 0 top
NOREF#199  -  []  294.36 181.55 0 top
NOREF#200  -  []  345.48 175.27 0 top
NOREF#201  -  []  535.13 208.56 90 top
NOREF#202  -  []  151.24 484.08 0 top
NOREF#203  -  []  267.71 249.57 90 top
NOREF#204  -  []  269.11 172.64 90 top
NOREF#205  -  []  214.68 193.86 90 top
NOREF#206  -  []  361.04 135.78 0 top
NOREF#207  -  []  254.68 242.3 90 top
NOREF#208  -  []  475.32 239.96 90 top
NOREF#209  -  []  275.44 254.76 90 top
NOREF#210  -  []  87.91 137.16 0 top
NOREF#211  -  []  458.37 212.88 0 top
NOREF#212  -  []  233.11 250.23 90 top
NOREF#213  -  []  295.51 252.91 90 top
NOREF#214  -  []  85 291.64 0 top
NOREF#215  -  []  306.54 133.3 90 top
NOREF#216  -  []  386.25 484.08 0 top
NOREF#217  -  []  311.89 186.26 0 top
NOREF#218  -  []  349.61 245.05 0 top
NOREF#219  -  []  349.83 269.1 90 top
NOREF#220  -  []  103.28 234.26 0 top
NOREF#221  -  []  251.16 251.72 0 top
NOREF#222  -  []  375.02 484.08 0 top
NOREF#223  -  []  289.83 225.63 90 top
NOREF#224  -  []  306.63 247.43 0 top
NOREF#225  -  []  541.95 196.24 90 top
NOREF#226  -  []  355.44 254.76 90 top
NOREF#227  -  []  304.09 232.66 0 top
NOREF#228  -  []  381.93 467.68 0 top
NOREF#229  -  []  144.23 484.08 0 top
NOREF#230  -  []  360.69 484.4 0 top
NOREF#231  -  []  414.1 462.53 90 top
NOREF#232  -  []  102.34 249.7 0 top
NOREF#233  -  []  229.86 244.37 90 top
NOREF#234  -  []  255.51 241.35 90 top
NOREF#235  -  []  265.33 135.72 0 top
NOREF#236  -  []  321.04 135.78 0 top
NOREF#237  -  []  264.41 171.76 90 top
NOREF#238  -  []  255.09 206.49 0 top
NOREF#239  -  []  480.26 179.13 0 top
NOREF#240  -  []  214.38 194.86 0 top
NOREF#241  -  []  127.27 483.84 90 top
NOREF#242  -  []  309.94 245.61 0 top
NOREF#243  -  []  228.67 241.29 0 top
NOREF#244  -  []  272.91 178.51 90 top
NOREF#245  -  []  388.75 484.4 0 top
NOREF#246  -  []  268.15 242.25 0 top
NOREF#247  -  []  251.96 182 0 top
NOREF#248  -  []  236.16 249.57 90 top
NOREF#249  -  []  235.44 194.76 90 top
NOREF#250  -  []  111.99 220.75 0 top
NOREF#251  -  []  558.12 150.18 0 top
NOREF#252  -  []  480.26 137.53 90 top
NOREF#253  -  []  551.91 149.79 0 top
NOREF#254  -  []  269.94 245.61 0 top
NOREF#255  -  []  232.05 241.59 0 top
NOREF#256  -  []  308.67 241.94 0 top
NOREF#257  -  []  270.16 244.72 90 top
NOREF#258  -  []  260.54 484.08 0 top
NOREF#259  -  []  221.62 297 90 top
NOREF#260  -  []  115.04 186.2 0 top
NOREF#261  -  []  357.14 144.1 90 top
NOREF#262  -  []  325.91 484.08 0 top
NOREF#263  -  []  540.55 206.94 0 top
NOREF#264  -  []  307.7 189.57 90 top
NOREF#265  -  []  103.28 205.05 0 top
NOREF#266  -  []  311.81 239.17 90 top
NOREF#267  -  []  283.96 287.7 90 top
NOREF#268  -  []  344.42 176.56 0 top
NOREF#269  -  []  104.66 225.65 0 top
NOREF#270  -  []  83.67 262.04 0 top
NOREF#271  -  []  267.99 241.05 0 top
NOREF#272  -  []  335.76 192.32 0 top
NOREF#273  -  []  292.33 182.3 90 top
NOREF#274  -  []  540.94 233.23 90 top
NOREF#275  -  []  212.13 13.07 0 top
NOREF#276  -  []  312.35 289.79 90 top
NOREF#277  -  []  79.1 264.51 0 top
NOREF#278  -  []  348.67 181.95 0 top
NOREF#279  -  []  274.07 483.75 90 top
NOREF#280  -  []  228.01 233.3 90 top
NOREF#281  -  []  493.92 206.32 0 top
NOREF#282  -  []  275.19 208.15 90 top
NOREF#283  -  []  98.19 154.45 0 top
NOREF#284  -  []  111.42 159.47 0 top
NOREF#285  -  []  232.57 246.5 0 top
NOREF#286  -  []  300.96 187.12 90 top
NOREF#287  -  []  110.69 157.1 90 top
NOREF#288  -  []  295.38 253.86 90 top
NOREF#289  -  []  232.23 167.99 0 top
NOREF#290  -  []  329.83 263.63 90 top
NOREF#291  -  []  331.64 253.86 90 top
NOREF#292  -  []  212.96 254.76 0 top
NOREF#293  -  []  311.71 184.72 0 top
NOREF#294  -  []  333.39 255.18 0 top
NOREF#295  -  []  77.67 288.67 0 top
NOREF#296  -  []  358.57 171.63 90 top
NOREF#297  -  []  83.67 289.47 0 top
NOREF#298  -  []  548.24 234.56 0 top
NOREF#299  -  []  402.74 463.08 90 top
NOREF#300  -  []  462.68 158.26 0 top
NOREF#301  -  []  329.83 222.63 90 top
NOREF#302  -  []  289.83 203.63 90 top
NOREF#303  -  []  110.69 188.85 90 top
NOREF#304  -  []  371.23 236.59 90 top
NOREF#305  -  []  312.87 244.43 0 top
NOREF#306  -  []  273.99 208.8 0 top
NOREF#307  -  []  270.5 190.23 90 top
NOREF#308  -  []  226.85 250.05 0 top
NOREF#309  -  []  314.75 286.43 0 top
NOREF#310  -  []  227.65 258.45 90 top
NOREF#311  -  []  270.5 250.23 90 top
NOREF#312  -  []  353.07 180.67 90 top
NOREF#313  -  []  350.55 134.62 90 top
NOREF#314  -  []  542.83 167.08 0 top
NOREF#315  -  []  270.13 267.46 90 top
NOREF#316  -  []  215.56 180.9 90 top
NOREF#317  -  []  289.83 222.63 90 top
NOREF#318  -  []  119.44 154.45 0 top
NOREF#319  -  []  273.73 243.95 90 top
NOREF#320  -  []  352.21 244.43 0 top
NOREF#321  -  []  278.48 484.4 0 top
NOREF#322  -  []  232.35 289.79 90 top
NOREF#323  -  []  544.41 147.59 90 top
NOREF#324  -  []  263.27 175.18 0 top
NOREF#325  -  []  352.7 190.05 0 top
NOREF#326  -  []  506.92 207.65 0 top
NOREF#327  -  []  123.08 170.76 0 top
NOREF#328  -  []  275.91 164.78 0 top
NOREF#329  -  []  353.56 249.57 90 top
NOREF#330  -  []  344.52 290.37 90 top
NOREF#331  -  []  304.87 484.08 0 top
NOREF#332  -  []  331.34 183.29 0 top
NOREF#333  -  []  354.67 462.53 90 top
NOREF#334  -  []  320.04 140.12 0 top
NOREF#335  -  []  67.34 265.1 90 top
NOREF#336  -  []  533.93 207.81 0 top
NOREF#337  -  []  231.61 241.11 90 top
NOREF#338  -  []  539.84 220.37 0 top
NOREF#339  -  []  306.54 134.08 0 top
NOREF#340  -  []  461.17 134.17 0 top
NOREF#341  -  []  117.24 249.7 0 top
NOREF#342  -  []  268.25 173.12 0 top
NOREF#343  -  []  19.24 483.76 90 top
NOREF#344  -  []  210.56 252.32 0 top
NOREF#345  -  []  228.53 184.61 90 top
NOREF#346  -  []  254.66 181.23 0 top
NOREF#347  -  []  557.52 295.46 90 top
NOREF#348  -  []  268.25 233.12 0 top
NOREF#349  -  []  309.5 210 0 top
NOREF#350  -  []  350.01 270.51 0 top
NOREF#351  -  []  91.44 302.01 0 top
NOREF#352  -  []  309.04 261.34 90 top
NOREF#353  -  []  232.87 244.43 0 top
NOREF#354  -  []  273.43 186.02 90 top
NOREF#355  -  []  295.01 193.56 0 top
NOREF#356  -  []  355.81 242.28 90 top
NOREF#357  -  []  85.49 217.95 0 top
NOREF#358  -  []  312.21 184.43 0 top
NOREF#359  -  []  313.08 240.67 90 top
NOREF#360  -  []  317.95 135.78 90 top
NOREF#361  -  []  228.32 239.21 0 top
NOREF#362  -  []  146.31 483.84 90 top
NOREF#363  -  []  123.06 483.84 90 top
NOREF#364  -  []  79.1 290.69 0 top
NOREF#365  -  []  228.67 181.3 0 top
NOREF#366  -  []  254.81 252.91 90 top
NOREF#367  -  []  271.16 181.77 90 top
NOREF#368  -  []  271.11 297.8 90 top
NOREF#369  -  []  308.55 178.53 90 top
NOREF#370  -  []  295.09 266.49 0 top
NOREF#371  -  []  158.1 2.28 90 top
NOREF#372  -  []  335.16 251.22 90 top
NOREF#373  -  []  524.27 484.08 0 top
NOREF#374  -  []  477.58 221.76 0 top
NOREF#375  -  []  255.71 180.7 0 top
NOREF#376  -  []  315.19 208.15 90 top
NOREF#377  -  []  354.44 141.43 0 top
NOREF#378  -  []  334.66 252.79 0 top
NOREF#379  -  []  310.74 181.59 0 top
NOREF#380  -  []  387.65 484.08 0 top
NOREF#381  -  []  251.16 180.15 0 top
NOREF#382  -  []  349.3 185.2 0 top
NOREF#383  -  []  230.7 209.35 90 top
NOREF#384  -  []  350.59 240.4 0 top
NOREF#385  -  []  270.74 241.59 0 top
NOREF#386  -  []  26.26 483.76 90 top
NOREF#387  -  []  269.28 181.06 0 top
NOREF#388  -  []  310.57 210.84 0 top
NOREF#389  -  []  347.03 181.43 90 top
NOREF#390  -  []  538.06 483.75 90 top
NOREF#391  -  []  231.81 239.17 90 top
NOREF#392  -  []  322.33 233.13 90 top
NOREF#393  -  []  458.37 199.87 90 top
NOREF#394  -  []  274.1 286.98 90 top
NOREF#395  -  []  227.05 134.86 0 top
NOREF#396  -  []  299.25 484.08 0 top
NOREF#397  -  []  344.52 291.64 0 top
NOREF#398  -  []  315.19 268.15 90 top
NOREF#399  -  []  80 290.97 90 top
NOREF#400  -  []  36.28 484.4 0 top
NOREF#401  -  []  134.23 484.32 0 top
NOREF#402  -  []  104.54 154.45 0 top
NOREF#403  -  []  353.43 246.02 90 top
NOREF#404  -  []  365.47 462.53 90 top
NOREF#405  -  []  335.76 180.75 0 top
NOREF#406  -  []  563.28 154.21 90 top
NOREF#407  -  []  421.61 290.38 90 top
NOREF#408  -  []  472.43 192.01 0 top
NOREF#409  -  []  355.08 484.4 0 top
NOREF#410  -  []  547.34 222.67 0 top
NOREF#411  -  []  483.31 162.33 90 top
NOREF#412  -  []  351.12 183.92 90 top
NOREF#413  -  []  469.03 158.26 0 top
NOREF#414  -  []  226.85 190.05 0 top
NOREF#415  -  []  482.26 226.78 0 top
NOREF#416  -  []  232.46 250.23 90 top
NOREF#417  -  []  262.95 290.44 90 top
NOREF#418  -  []  374.72 484.4 0 top
NOREF#419  -  []  229.53 241.46 90 top
NOREF#420  -  []  223.95 233.9 90 top
NOREF#421  -  []  310.92 244.4 0 top
NOREF#422  -  []  254.38 243.29 0 top
NOREF#423  -  []  351.15 246.31 90 top
NOREF#424  -  []  309.53 181.46 90 top
NOREF#425  -  []  312.9 249.57 90 top
NOREF#426  -  []  292.33 193.86 90 top
NOREF#427  -  []  343.95 174.46 90 top
NOREF#428  -  []  491.48 160.26 0 top
NOREF#429  -  []  311.11 297.8 90 top
NOREF#430  -  []  116.42 222.97 90 top
NOREF#431  -  []  344.42 236.56 0 top
NOREF#432  -  []  476.48 192.81 0 top
NOREF#433  -  []  251.34 243.29 0 top
NOREF#434  -  []  124.28 138.36 90 top
NOREF#435  -  []  225.48 175.27 0 top
NOREF#436  -  []  213.54 239.12 90 top
NOREF#437  -  []  112.42 232.07 0 top
NOREF#438  -  []  109.42 228.97 90 top
NOREF#439  -  []  547.34 235.63 0 top
NOREF#440  -  []  307.75 232.44 90 top
NOREF#441  -  []  400.28 484.08 0 top
NOREF#442  -  []  57.83 272.89 0 top
NOREF#443  -  []  232.22 181.15 0 top
NOREF#444  -  []  290.84 484.08 0 top
NOREF#445  -  []  227.95 261.38 0 top
NOREF#446  -  []  463.78 192.81 0 top
NOREF#447  -  []  264.52 286.43 0 top
NOREF#448  -  []  236.23 223.88 90 top
NOREF#449  -  []  345.48 233.73 90 top
NOREF#450  -  []  239.47 260.55 90 top
NOREF#451  -  []  481.53 224.41 90 top
NOREF#452  -  []  238.7 260.1 90 top
NOREF#453  -  []  339.12 300.75 0 top
NOREF#454  -  []  334.81 252.91 90 top
NOREF#455  -  []  398.14 467.68 0 top
NOREF#456  -  []  267.03 181.43 90 top
NOREF#457  -  []  259.33 256.13 0 top
NOREF#458  -  []  263.27 173.14 0 top
NOREF#459  -  []  327.32 484.08 0 top
NOREF#460  -  []  269.85 184.37 90 top
NOREF#461  -  []  371.18 467.63 0 top
NOREF#462  -  []  295.49 183.29 90 top
NOREF#463  -  []  233.63 243.41 0 top
NOREF#464  -  []  403.55 467.68 0 top
NOREF#465  -  []  351.71 184.72 0 top
NOREF#466  -  []  234.91 164.78 0 top
NOREF#467  -  []  123.08 141.55 0 top
NOREF#468  -  []  277.95 135.78 90 top
NOREF#469  -  []  234.82 285.62 0 top
NOREF#470  -  []  251.83 170.23 315 top
NOREF#471  -  []  291.64 253.86 90 top
NOREF#472  -  []  228.09 268.12 0 top
NOREF#473  -  []  301.56 483.75 90 top
NOREF#474  -  []  487.26 163.28 90 top
NOREF#475  -  []  277.14 141.43 90 top
NOREF#476  -  []  336.91 181.35 90 top
NOREF#477  -  []  265.44 146.16 90 top
NOREF#478  -  []  275.44 254.76 90 top
NOREF#479  -  []  308.01 233.3 90 top
NOREF#480  -  []  476.48 161.06 0 top
NOREF#481  -  []  225.14 299.77 0 top
NOREF#482  -  []  553.49 149.01 90 top
NOREF#483  -  []  383.44 484.08 0 top
NOREF#484  -  []  267.99 241.7 0 top
NOREF#485  -  []  334.29 195.5 0 top
NOREF#486  -  []  236.61 287.27 90 top
NOREF#487  -  []  351.8 250.23 90 top
NOREF#488  -  []  271.16 243.72 90 top
NOREF#489  -  []  16.44 483.76 90 top
NOREF#490  -  []  305.48 233.73 90 top
NOREF#491  -  []  243.96 287.7 90 top
NOREF#492  -  []  213.32 12.42 90 top
NOREF#493  -  []  350.26 184.4 0 top
NOREF#494  -  []  233.11 183.76 90 top
NOREF#495  -  []  227.91 244.41 90 top
NOREF#496  -  []  490.86 199.63 90 top
NOREF#497  -  []  272.23 167.99 0 top
NOREF#498  -  []  122.18 236.47 0 top
NOREF#499  -  []  295.71 242 0 top
NOREF#500  -  []  568.42 164.1 0 top
NOREF#501  -  []  309.94 185.61 0 top
NOREF#502  -  []  311.81 241.77 90 top
NOREF#503  -  []  87.91 200.66 0 top
NOREF#504  -  []  234.95 242.76 0 top
NOREF#505  -  []  546.96 212.13 0 top
NOREF#506  -  []  346.74 298.45 0 top
NOREF#507  -  []  293.34 484.4 0 top
NOREF#508  -  []  104.48 233.61 90 top
NOREF#509  -  []  358.18 484.08 0 top
NOREF#510  -  []  102.36 225.12 90 top
NOREF#511  -  []  270.59 244.96 0 top
NOREF#512  -  []  242.24 135.14 90 top
NOREF#513  -  []  46.16 254.72 0 top
NOREF#514  -  []  298.75 483.75 90 top
NOREF#515  -  []  255.09 261.99 90 top
NOREF#516  -  []  355.44 194.76 90 top
NOREF#517  -  []  348.25 173.12 0 top
NOREF#518  -  []  414.95 467.08 0 top
NOREF#519  -  []  232.8 187.32 90 top
NOREF#520  -  []  377.32 483.75 90 top
NOREF#521  -  []  354.72 462.48 90 top
NOREF#522  -  []  334.3 179.37 90 top
NOREF#523  -  []  123.08 173.3 0 top
NOREF#524  -  []  105.64 189 0 top
NOREF#525  -  []  48.53 248.1 0 top
NOREF#526  -  []  310.74 190.05 0 top
NOREF#527  -  []  271.19 269.1 90 top
NOREF#528  -  []  354.23 247.83 0 top
NOREF#529  -  []  230.62 246.5 0 top
NOREF#530  -  []  231.15 250.23 90 top
NOREF#531  -  []  156.68 484.32 0 top
NOREF#532  -  []  490.28 190.01 0 top
NOREF#533  -  []  291.16 180.15 0 top
NOREF#534  -  []  303.95 233.34 90 top
NOREF#535  -  []  229.01 241.77 90 top
NOREF#536  -  []  89.64 217.95 0 top
NOREF#537  -  []  335.71 240.7 0 top
NOREF#538  -  []  270.16 184.72 90 top
NOREF#539  -  []  79.1 263.26 0 top
NOREF#540  -  []  343.95 172.42 90 top
NOREF#541  -  []  268.67 241.29 0 top
NOREF#542  -  []  302.95 292.35 90 top
NOREF#543  -  []  397.34 463.08 90 top
NOREF#544  -  []  211.83 170.23 315 top
NOREF#545  -  []  313.49 295.27 90 top
NOREF#546  -  []  272.91 241.11 90 top
NOREF#547  -  []  355.12 298.76 90 top
NOREF#548  -  []  224.52 288.97 0 top
NOREF#549  -  []  315.05 190.23 90 top
NOREF#550  -  []  269.3 185.85 0 top
NOREF#551  -  []  262.45 171.5 0 top
NOREF#552  -  []  245.95 273.47 0 top
NOREF#553  -  []  306.45 147.01 90 top
NOREF#554  -  []  347.9 184.41 90 top
NOREF#555  -  []  62.34 484.4 0 top
NOREF#556  -  []  537.16 484.08 0 top
NOREF#557  -  []  231.4 186.13 0 top
NOREF#558  -  []  277.95 143.66 90 top
NOREF#559  -  []  227.05 134.08 90 top
NOREF#560  -  []  353.1 243.75 90 top
NOREF#561  -  []  298.17 209.61 90 top
NOREF#562  -  []  409 467.63 0 top
NOREF#563  -  []  285.64 136.62 90 top
NOREF#564  -  []  271.78 243.92 90 top
NOREF#565  -  []  231.13 243.92 90 top
NOREF#566  -  []  355.12 300.55 0 top
NOREF#567  -  []  405.89 484.08 0 top
NOREF#568  -  []  196.37 286.37 90 top
NOREF#569  -  []  269.83 209.1 90 top
NOREF#570  -  []  237.11 224.14 90 top
NOREF#571  -  []  549.55 154.21 0 top
NOREF#572  -  []  347.99 181.7 0 top
NOREF#573  -  []  303.95 234.46 90 top
NOREF#574  -  []  310.74 241.59 0 top
NOREF#575  -  []  334.68 253.86 90 top
NOREF#576  -  []  377.83 484.08 0 top
NOREF#577  -  []  305.88 175.27 0 top
NOREF#578  -  []  87.81 177.32 0 top
NOREF#579  -  []  541.95 210.34 90 top
NOREF#580  -  []  354.48 242.93 90 top
NOREF#581  -  []  235.06 190.23 90 top
NOREF#582  -  []  212.33 193.86 90 top
NOREF#583  -  []  102.34 154.45 0 top
NOREF#584  -  []  317.14 146.64 90 top
NOREF#585  -  []  234.49 182.93 90 top
NOREF#586  -  []  267.57 245.37 90 top
NOREF#587  -  []  266.61 190.23 90 top
NOREF#588  -  []  351.94 187.8 0 top
NOREF#589  -  []  271.94 187.8 0 top
NOREF#590  -  []  350.5 250.23 90 top
NOREF#591  -  []  232.35 292.46 90 top
NOREF#592  -  []  274.91 164.78 0 top
NOREF#593  -  []  113.09 249.7 0 top
NOREF#594  -  []  346.45 147.01 90 top
NOREF#595  -  []  326.81 483.75 90 top
NOREF#596  -  []  72.69 293.24 0 top
NOREF#597  -  []  303.95 172.42 90 top
NOREF#598  -  []  293.39 195.18 0 top
NOREF#599  -  []  473.22 240.28 0 top
NOREF#600  -  []  272.23 172.39 90 top
NOREF#601  -  []  354.82 285.62 0 top
NOREF#602  -  []  253.16 181.35 90 top
NOREF#603  -  []  255.01 253.56 0 top
NOREF#604  -  []  352.91 178.51 90 top
NOREF#605  -  []  333.99 182.3 90 top
NOREF#606  -  []  307.05 134.86 0 top
NOREF#607  -  []  313.3 268.63 90 top
NOREF#608  -  []  307.41 133.69 0 top
NOREF#609  -  []  155.45 484.08 0 top
NOREF#610  -  []  316.16 189.57 90 top
NOREF#611  -  []  224.52 291.64 0 top
NOREF#612  -  []  46.4 484.08 0 top
NOREF#613  -  []  310.5 190.23 90 top
NOREF#614  -  []  212.66 193.56 0 top
NOREF#615  -  []  231.48 246.66 90 top
NOREF#616  -  []  393.34 467.08 0 top
NOREF#617  -  []  396.07 484.08 0 top
NOREF#618  -  []  88.89 219.95 0 top
NOREF#619  -  []  568.79 166.69 0 top
NOREF#620  -  []  349.94 185.61 0 top
NOREF#621  -  []  271.4 186.13 0 top
NOREF#622  -  []  223.09 233.82 0 top
NOREF#623  -  []  237.09 266.12 90 top
NOREF#624  -  []  373.32 484.4 0 top
NOREF#625  -  []  291.16 176.15 90 top
NOREF#626  -  []  525.37 484.4 0 top
NOREF#627  -  []  303.09 174.38 0 top
NOREF#628  -  []  356.11 224.14 90 top
NOREF#629  -  []  230.26 184.4 0 top
NOREF#630  -  []  92.94 252.5 0 top
NOREF#631  -  []  343.95 173.9 90 top
NOREF#632  -  []  294.54 483.75 90 top
NOREF#633  -  []  305.94 203.76 0 top
NOREF#634  -  []  85 279.38 0 top
NOREF#635  -  []  255.49 194.86 90 top
NOREF#636  -  []  312.04 190.05 0 top
NOREF#637  -  []  311.27 239.68 90 top
NOREF#638  -  []  272.35 292.46 90 top
NOREF#639  -  []  116.42 159.47 90 top
NOREF#640  -  []  293.29 253.86 90 top
NOREF#641  -  []  230.48 244.57 90 top
NOREF#642  -  []  332.33 253.86 90 top
NOREF#643  -  []  271.03 185.37 0 top
NOREF#644  -  []  99.29 220.75 0 top
NOREF#645  -  []  352.23 232.39 90 top
NOREF#646  -  []  332.78 239.12 90 top
NOREF#647  -  []  104.48 201.86 90 top
NOREF#648  -  []  348.14 242.25 0 top
NOREF#649  -  []  237.49 261.06 90 top
NOREF#650  -  []  468.6 169.67 0 top
NOREF#651  -  []  251.34 194.86 0 top
NOREF#652  -  []  117.42 240.62 90 top
NOREF#653  -  []  558.12 166.69 0 top
NOREF#654  -  []  265.88 175.27 0 top
NOREF#655  -  []  344.71 467.08 0 top
NOREF#656  -  []  265.43 295.89 90 top
NOREF#657  -  []  287.53 483.75 90 top
NOREF#658  -  []  312.22 183.1 0 top
NOREF#659  -  []  335.01 242 0 top
NOREF#660  -  []  87.91 233.68 90 top
NOREF#661  -  []  534.23 206.74 0 top
NOREF#662  -  []  352.57 186.5 0 top
NOREF#663  -  []  348.62 245.61 0 top
NOREF#664  -  []  265.94 263.76 0 top
NOREF#665  -  []  307.9 242.43 90 top
NOREF#666  -  []  311.4 241.59 0 top
NOREF#667  -  []  42.19 484.08 0 top
NOREF#668  -  []  350.59 180.4 0 top
NOREF#669  -  []  83.2 276.6 90 top
NOREF#670  -  []  315.13 183 0 top
NOREF#671  -  []  293.86 241.35 90 top
NOREF#672  -  []  334.29 183.93 0 top
NOREF#673  -  []  98.19 249.7 0 top
NOREF#674  -  []  349.53 181.46 90 top
NOREF#675  -  []  409.55 467.08 0 top
NOREF#676  -  []  463.17 169.27 90 top
NOREF#677  -  []  364.92 463.08 90 top
NOREF#678  -  []  570.88 417.57 90 top
NOREF#679  -  []  198.56 287.03 90 top
NOREF#680  -  []  243.06 270.76 90 top
NOREF#681  -  []  243.33 272.85 90 top
NOREF#682  -  []  472.43 255.51 0 top
NOREF#683  -  []  230.55 134.62 0 top
NOREF#684  -  []  291.16 247.72 90 top
NOREF#685  -  []  110.69 220.6 90 top
NOREF#686  -  []  354.82 284.84 90 top
NOREF#687  -  []  310.16 244.72 90 top
NOREF#688  -  []  257.83 252.37 0 top
NOREF#689  -  []  123.08 139.01 0 top
NOREF#690  -  []  295.56 240.9 90 top
NOREF#691  -  []  268.66 484.4 0 top
NOREF#692  -  []  475.5 197.71 0 top
NOREF#693  -  []  308.67 181.95 0 top
NOREF#694  -  []  215.71 242 90 top
NOREF#695  -  []  78.8 264.19 0 top
NOREF#696  -  []  504.01 210.17 0 top
NOREF#697  -  []  347.99 181.06 0 top
NOREF#698  -  []  232.23 170.19 90 top
NOREF#699  -  []  358.57 231.63 90 top
NOREF#700  -  []  244.17 272.99 0 top
NOREF#701  -  []  473.2 165.43 90 top
NOREF#702  -  []  352.9 249.57 90 top
NOREF#703  -  []  232.23 227.99 0 top
NOREF#704  -  []  92.33 133.71 90 top
NOREF#705  -  []  387.13 462.48 90 top
NOREF#706  -  []  237.59 483.75 90 top
NOREF#707  -  []  211.16 247.72 90 top
NOREF#708  -  []  109.42 133.72 90 top
NOREF#709  -  []  231.89 186.26 0 top
NOREF#710  -  []  331.16 251.72 0 top
NOREF#711  -  []  274.61 297.98 90 top
NOREF#712  -  []  493.02 142.49 0 top
NOREF#713  -  []  367.71 484.4 0 top
NOREF#714  -  []  102.38 233.93 0 top
NOREF#715  -  []  333.22 238.82 0 top
NOREF#716  -  []  269.01 181.77 90 top
NOREF#717  -  []  49.74 246.93 90 top
NOREF#718  -  []  345.05 146.58 0 top
NOREF#719  -  []  349 241.77 90 top
NOREF#720  -  []  460.48 253.51 0 top
NOREF#721  -  []  458.75 142.24 90 top
NOREF#722  -  []  66.13 266.27 0 top
NOREF#723  -  []  112.42 200.32 90 top
NOREF#724  -  []  239.77 263.03 0 top
NOREF#725  -  []  294.31 242 0 top
NOREF#726  -  []  214.36 193.12 0 top
NOREF#727  -  []  493.92 208.86 0 top
NOREF#728  -  []  247.41 483.75 90 top
NOREF#729  -  []  380.33 484.4 0 top
NOREF#730  -  []  351.78 243.92 90 top
NOREF#731  -  []  333.1 191.59 0 top
NOREF#732  -  []  470.13 161.06 0 top
NOREF#733  -  []  270.55 134.62 0 top
NOREF#734  -  []  549.44 220.95 90 top
NOREF#735  -  []  293.39 243.61 0 top
NOREF#736  -  []  332.54 242.65 90 top
NOREF#737  -  []  230.62 185.85 0 top
NOREF#738  -  []  272.23 227.99 90 top
NOREF#739  -  []  213.39 195.18 0 top
NOREF#740  -  []  293.61 193.56 0 top
NOREF#741  -  []  224.52 293.03 90 top
NOREF#742  -  []  294.36 193.12 0 top
NOREF#743  -  []  241.96 270.25 0 top
NOREF#744  -  []  78.8 262.93 0 top
NOREF#745  -  []  300.67 292.95 0 top
NOREF#746  -  []  263.09 232.9 0 top
NOREF#747  -  []  349.85 184.37 90 top
NOREF#748  -  []  279.73 186.59 0 top
NOREF#749  -  []  313.08 242.62 90 top
NOREF#750  -  []  232.2 288.28 0 top
NOREF#751  -  []  275.44 194.76 90 top
NOREF#752  -  []  271.69 269.1 0 top
NOREF#753  -  []  48.16 249.91 0 top
NOREF#754  -  []  213.22 251.59 0 top
NOREF#755  -  []  90.89 151.25 90 top
NOREF#756  -  []  300.81 187.17 90 top
NOREF#757  -  []  311.27 245.2 0 top
NOREF#758  -  []  60.8 254.33 90 top
NOREF#759  -  []  349.96 181.3 0 top
NOREF#760  -  []  233.4 298.37 0 top
NOREF#761  -  []  230.41 180.16 0 top
NOREF#762  -  []  353.68 484.4 0 top
NOREF#763  -  []  55.46 268.47 0 top
NOREF#764  -  []  253.54 250.69 90 top
NOREF#765  -  []  525.67 484.08 0 top
NOREF#766  -  []  480.26 201.03 90 top
NOREF#767  -  []  104.54 217.95 0 top
NOREF#768  -  []  215.76 180.75 0 top
NOREF#769  -  []  313.62 183.41 0 top
NOREF#770  -  []  233.81 243.65 0 top
NOREF#771  -  []  138.44 484.32 0 top
NOREF#772  -  []  308.14 182.25 0 top
NOREF#773  -  []  140.02 484.08 0 top
NOREF#774  -  []  274.23 247.83 0 top
NOREF#775  -  []  28.16 484.08 0 top
NOREF#776  -  []  124.28 170.11 90 top
